# Altium PCB Relay-Switching-Board-v2.0.PcbDoc (part 5 of 5)
Units mil, origin at the board's own origin, x right, y up, seen from the top; angles counter-clockwise.
Board outline 5905.51 x 4330.71 mil, 4 copper layers (Top Layer, Layer 1, Layer 2, Bottom Layer), stack 62.047 mil thick; 211 components, 133 nets, 602 pads, 336 vias.
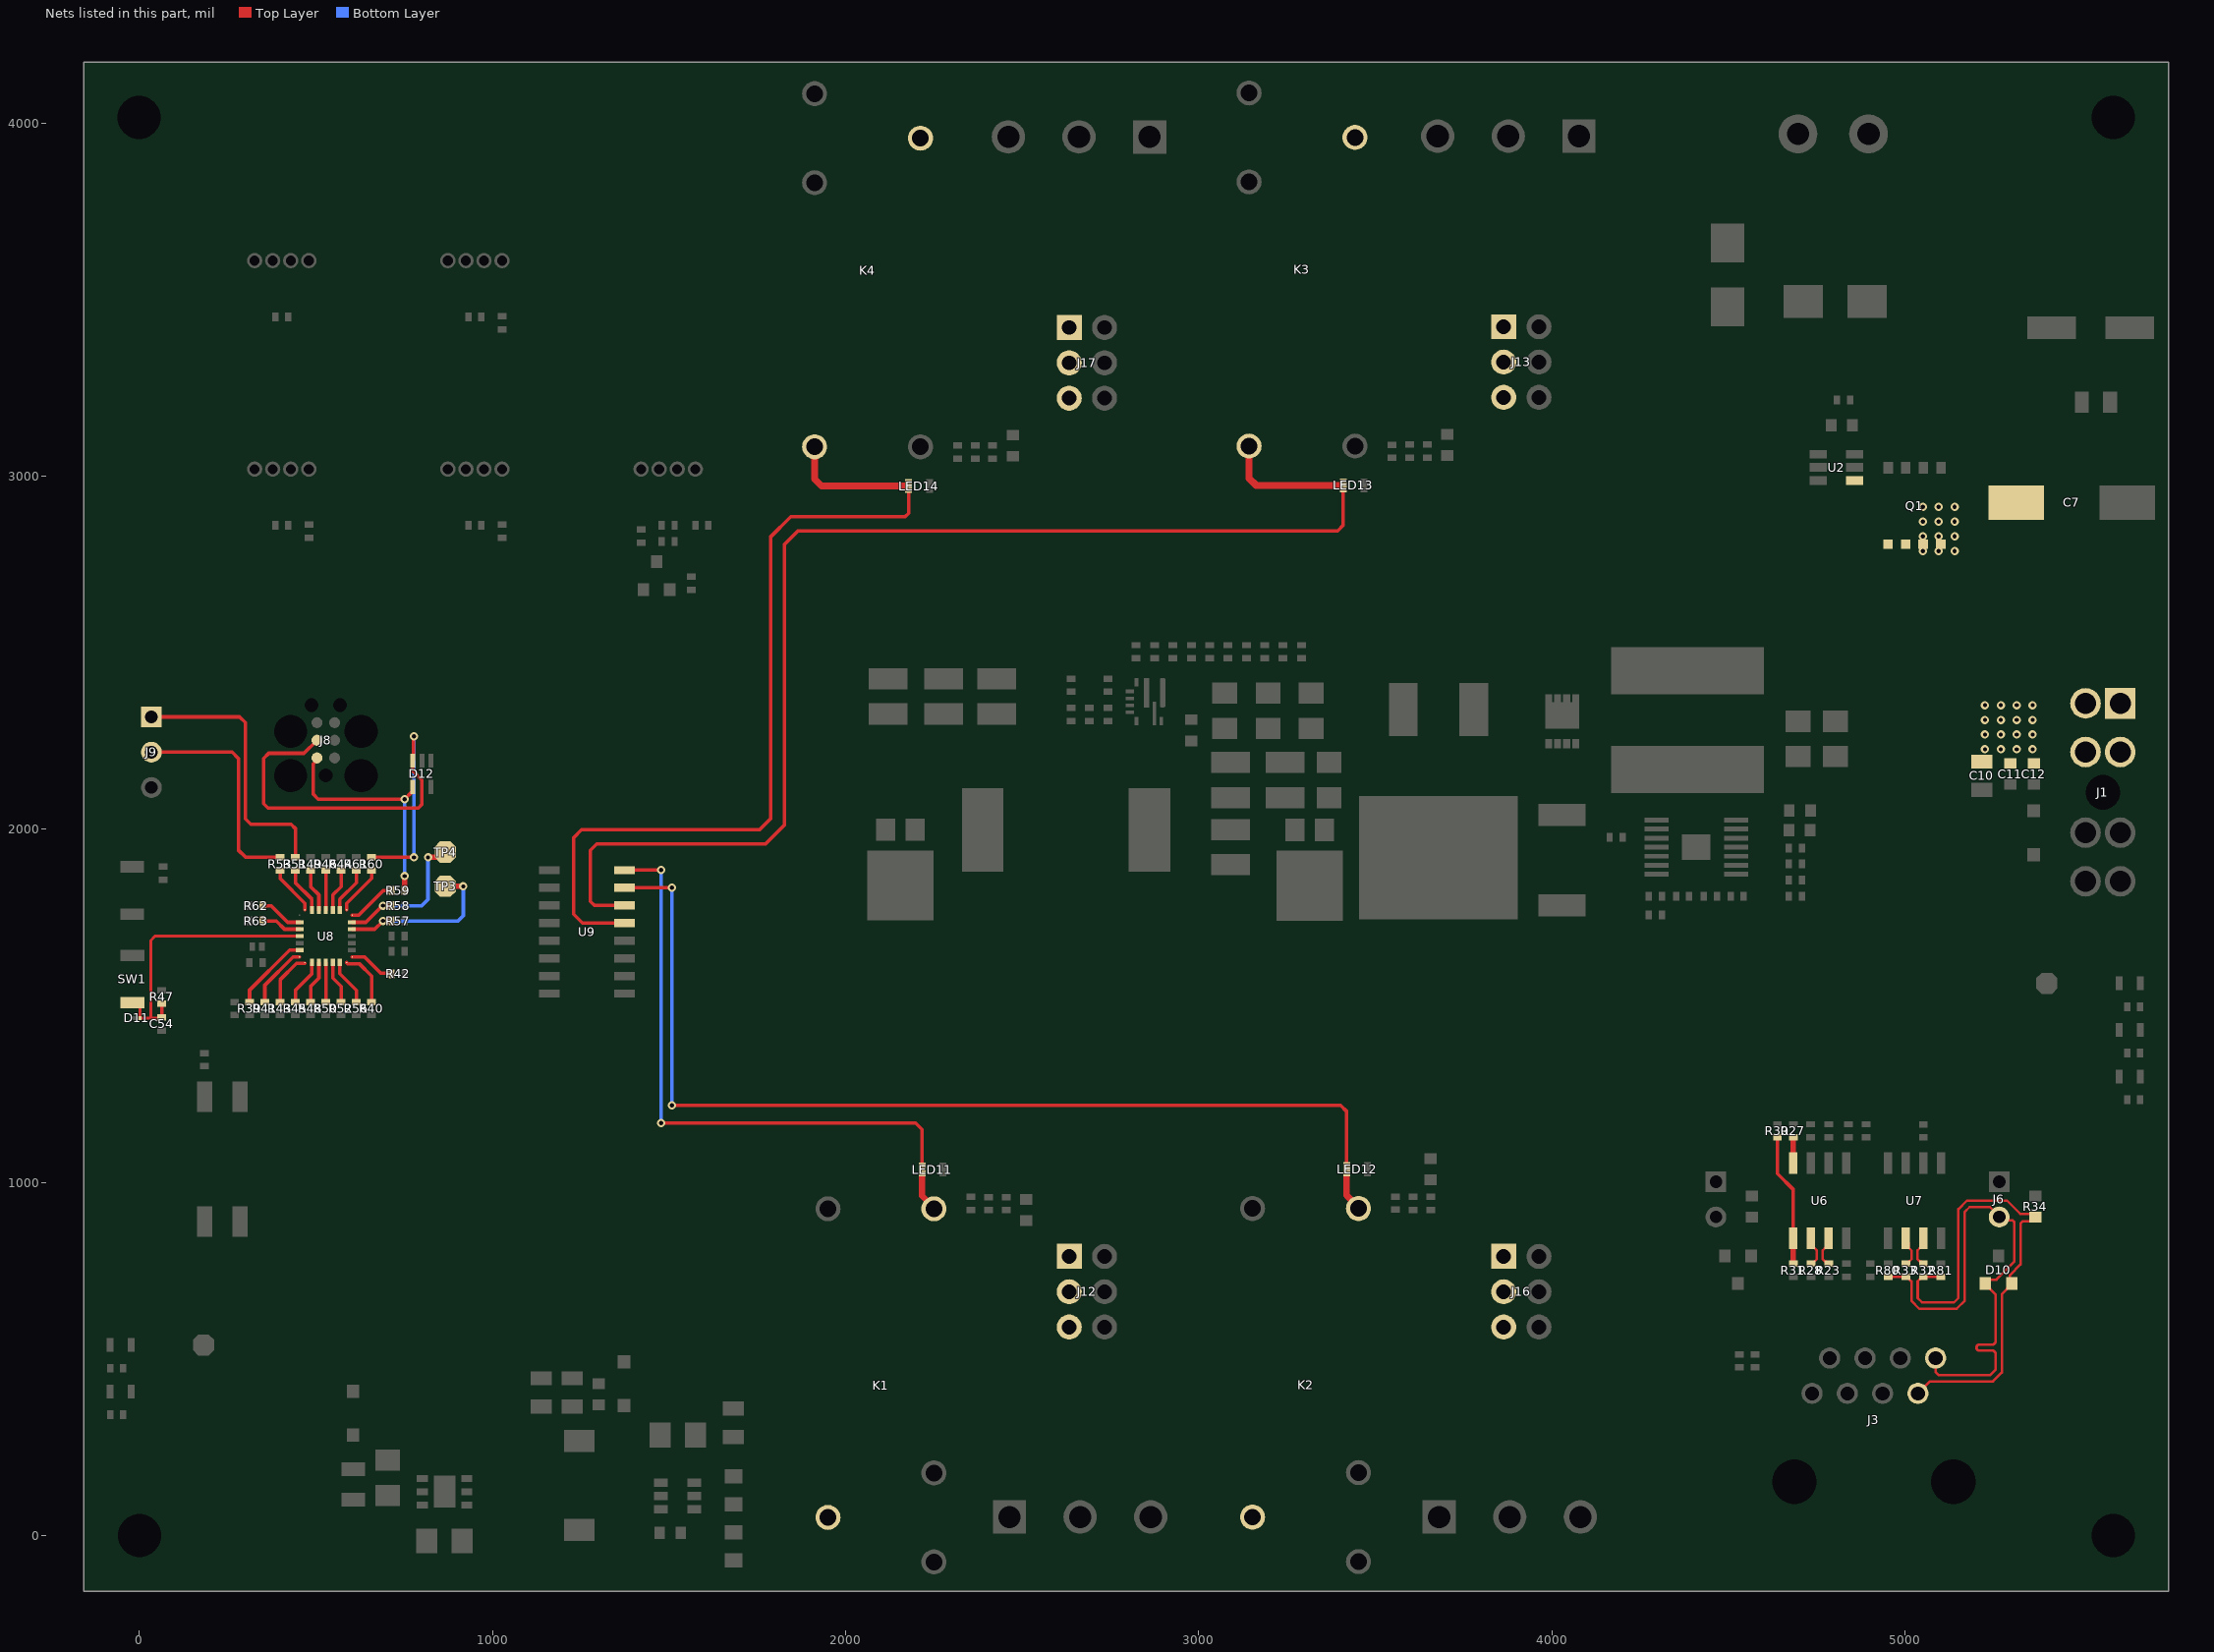
[diagram p5: the nets of this part, all layers, seen from the top]

## Via types
v1: diameter 23.62, hole 11.81, Top Layer to Bottom Layer, tented both sides, 336 vias

## Nets (pads, with @x,y where several pads share a name; then routed paths per layer and width w, separated by ;. In a path a pad name is that pad's centre, name@x,y a point inside that pad or via, vN(x,y) a via of type N, cw(c..) or ccw(c..) an arc to the next point about the centre after c; other vN are vias at no path point) (continued)
NetR23_1: R23.1 U6.7 | length 83.9
  Top Layer w7: R23.1@4784,769.84 4778.5,775.34 4774.47,775.34 4767.6,782.21 4767.6,807.91 4775.13,815.44 4775.68,815.44 4784,823.76 U6.7@4784,837.45
NetR27_2: R27.2 U6.4 | length 72.8
  Top Layer w15: U6.4@4683.99,1055.05 R27.2@4683.99,1127.84
NetR28_1: R28.1 U6.6 | length 79.9
  Top Layer w7: U6.6@4734,837.45 4742.3,829.14 4742.3,815.27 4750.54,807.03 4750.54,782.88 4743,775.34 R28.1@4737.5,769.84
NetR30_2: R30.2 R31.2 U6.5 | length 371.6
  Top Layer w10: R30.2@4638.99,1127.84 4638.99,1024.63 4683.99,979.63 U6.5@4683.99,842.45
  Top Layer w15: R31.2@4683.99,774.85 U6.5@4683.99,842.45
NetR32_1: R32.1 U7.7 | length 83.8
  Top Layer w7: R32.1@5052.29,769.83 5046.79,775.33 5042.76,775.33 5035.9,782.2 5035.9,807.81 5043.53,815.44 5043.98,815.44 5052.29,823.76 U7.7@5052.29,837.45
NetR33_1: R33.1 U7.6 | length 79.9
  Top Layer w7: U7.6@5002.29,837.45 5010.6,829.14 5010.6,815.24 5018.83,807 5018.83,782.87 5011.3,775.34 R33.1@5005.79,769.83
NRST_MCU: C54.2 D11.2 R47.2 SW1.1 U8.4 | length 806
  Top Layer w8: SW1.1@-20.17,1509.15 -10.73,1509.15 1.41,1497.01 D11.2@1.41,1465.51 ; D11.2@2.73,1465.51 32.1,1465.51 ; C54.2@63.48,1467.52 61.48,1465.51 32.1,1465.51 ; R47.2@63.48,1506.46 R47.2@63.82,1506.8 ; U8.4@454.2,1697.44 44.25,1697.44 32.1,1685.29 32.1,1465.51
  Top Layer w10: C54.2@63.48,1467.52 R47.2@63.48,1506.46
PA0: R39.2 U8.6 | length 222.5
  Top Layer w10: R39.2@312.13,1511.19 312.13,1544.7 425.5,1658.07 U8.6@454.2,1658.07
PA1: R41.2 U8.7 | length 178.5
  Top Layer w10: R41.2@355.31,1511.19 355.31,1558.79 434.9,1638.39 U8.7@453.21,1638.39
PA2: R43.2 U8.8 | length 154.3
  Top Layer w10: R43.2@398.48,1509.22 R43.2@398.48,1511.19 398.48,1573.69 445.28,1620.48 468.96,1620.48
PA3: R45.2 U8.9 | length 131.9
  Top Layer w10: R45.2@441.66,1509.22 441.66,1544 488.65,1590.99 U8.9@488.65,1621.65
PA4: R48.2 U8.10 | length 122.2
  Top Layer w10: R48.2@484.84,1509.22 484.84,1554.95 508.33,1578.44 U8.10@508.33,1621.65
PA5: R50.2 U8.11 | length 112.4
  Top Layer w10: R50.2@528.02,1509.22 U8.11@528.02,1621.65
PA6: R52.2 U8.12 | length 122.2
  Top Layer w10: U8.12@547.7,1621.65 547.7,1578.44 571.19,1554.95 R52.2@571.19,1509.22
PA7: R56.2 U8.13 | length 131.9
  Top Layer w10: U8.13@567.39,1621.65 567.39,1590.99 614.37,1544 R56.2@614.37,1509.22
PA11: R57.2 TP3.1 U8.19 | length 489.5
  Top Layer w10: U8.19@601.84,1717.13 666.36,1717.13 v1(689.86,1740.62)
  Top Layer w15: v1(689.86,1740.62) R57.2@714.26,1740.61 ; TP3.1@866.29,1838.51 v1(917.29,1838.51)
  Bottom Layer w10: v1(689.86,1740.62) 902.01,1740.62 917.29,1755.91 v1(917.29,1838.51)
PA12: R58.2 TP4.1 U8.20 | length 452.7
  Top Layer w10: U8.20@601.84,1736.81 641.4,1736.81 687.86,1783.27 693.33,1783.27 v1@693.85,1783.8
  Top Layer w15: v1@693.85,1783.8 R58.2@714.26,1783.79 ; v1@817.29,1919.63 v1@818.39,1919.63 ; v1@818.39,1920.63 TP4.1@868.37,1920.63 ; TP4.1@854.4,1923.74 TP4.1@866.29,1935.63
  Bottom Layer w10: v1(689.85,1783.8) 799.65,1783.8 817.29,1801.44 v1@817.29,1919.63
  other v1: 817.29,1920.69
PA13: R59.1 U8.21 | length 140.6
  Top Layer w10: U8.21@602.82,1756.5 621.13,1756.5 691.61,1826.97 R59.1@714.27,1826.97
PA14: R60.1 U8.22 | length 140.6
  Top Layer w10: U8.22@587.07,1772.24 587.07,1790.56 657.55,1861.03 R60.1@657.55,1883.69
PA15: R61.2 U8.23 | length 131.9
  Top Layer w10: U8.23@567.39,1771.26 567.39,1801.93 614.37,1848.91 R61.2@614.37,1883.69
PB0: R40.2 U8.14 | length 161.6
  Top Layer w10: U8.14@587.07,1622.64 590.05,1619.66 622.52,1619.66 657.55,1584.63 R40.2@657.55,1511.19 R40.2@657.55,1509.22
PB1: R42.2 U8.15 | length 130.4
  Top Layer w10: U8.15@602.82,1638.39 637.78,1638.39 683.57,1592.59 R42.2@714.26,1592.59
PB3: R44.2 U8.24 | length 122.2
  Top Layer w10: U8.24@547.7,1771.26 547.7,1814.47 571.19,1837.96 R44.2@571.2,1883.69
PB4: R46.2 U8.25 | length 112.4
  Top Layer w10: U8.25@528.02,1771.26 R46.2@528.02,1883.69
PB5: R49.2 U8.26 | length 122.2
  Top Layer w10: R49.2@484.84,1883.69 484.84,1837.96 508.33,1814.47 U8.26@508.33,1771.26
PB6: R51.2 U8.27 | length 131.9
  Top Layer w10: R51.2@441.66,1883.69 441.66,1848.91 488.65,1801.93 U8.27@488.65,1771.26
PB7: R53.2 U8.28 | length 140.6
  Top Layer w10: R53.2@398.49,1883.69 398.48,1861.03 468.96,1790.56 U8.28@468.96,1772.24
PF0: R62.2 U8.2 | length 124.9
  Top Layer w10: R62.2@348.76,1783.8 372.83,1783.8 419.81,1736.81 U8.2@454.2,1736.81
PF1: R63.2 U8.3 | length 115.2
  Top Layer w10: R63.2@348.76,1740.62 387.5,1740.62 410.99,1717.13 U8.3@454.2,1717.13
REL-PWR-1: J12.1 J12.3 J12.5 K1.2
REL-PWR-2: J16.1 J16.3 J16.5 K2.2
REL-PWR-3: J13.1 J13.3 J13.5 K3.2
REL-PWR-4: J17.1 J17.3 J17.5 K4.2
RELAY-1: K1.5 LED11.2 U9.16 | length 1805.3
  Top Layer w10: U9.16@1373.59,1884.63 v1(1477.29,1884.63) ; v1(1477.29,1168.44) 2198.21,1168.44 2216.71,1149.95 LED11.2@2216.71,1036.63
  Top Layer w18: LED11.2@2216.71,1036.63 2216.71,962.43 2250.07,929.06 K1.5@2250.07,925.46
  Bottom Layer w10: v1(1477.29,1168.44) v1(1477.29,1884.63)
RELAY-2: K2.5 LED12.2 U9.15 | length 2957.4
  Top Layer w10: U9.15@1373.59,1834.63 v1(1508.29,1834.63) ; v1(1508.29,1218.44) 3401.62,1218.44 3419.12,1200.94 LED12.2@3419.12,1037.49
  Top Layer w18: LED12.2@3419.12,1037.49 3419.12,963.29 3452.49,929.92 K2.5@3452.49,926.31
  Bottom Layer w10: v1(1508.29,1218.44) v1(1508.29,1834.63)
RELAY-3: K3.5 LED13.2 U9.14 | length 3722.9
  Top Layer w10: U9.14@1373.59,1784.63 1288.86,1784.63 1277.29,1796.2 1277.29,1940.47 1295.55,1958.73 1773.27,1958.73 1827.29,2012.75 1827.29,2807.62 1865.12,2845.45 3393.58,2845.45 3409.01,2860.88 LED13.2@3409.01,2974.19
  Top Layer w20: K3.5@3142.54,3105.37 3142.54,2993.98 3162.32,2974.2 LED13.2@3408.55,2974.2
RELAY-4: K4.5 LED14.2 U9.13 | length 2630.3
  Top Layer w10: U9.13@1373.59,1734.63 1254.69,1734.63 1229.67,1759.65 1229.67,1976.07 1252.33,1998.73 1756.7,1998.73 1787.29,2029.32 1787.29,2827.62 1845.12,2885.45 2168.52,2885.45 2178.6,2895.53 LED14.2@2178.6,2972.06
  Top Layer w20: K4.5@1912.13,3103.23 1912.13,2991.84 1931.91,2972.06 LED14.2@2178.15,2972.06
RS485_N: D10.2 J3.2 R32.2 R34.2 R81.1 | length 1503
  Top Layer w7: J3.2@5036.95,402.74 5070.94,436.72 5249.22,436.72 5274.29,461.79 5274.29,683.81 5289.21,698.74 5290.05,698.74 5302.69,711.38 D10.2@5302.69,713.35 5297.47,718.57 5297.47,737.86 5327.57,767.96 5327.57,883.9 5333.94,890.27 5357.82,890.27 R34.2@5369.32,901.77 5359.93,911.16 5326.45,911.16 5289.27,948.34 5175.65,948.34 5151.73,924.43 5151.73,672.92 5139.16,660.35 5048.31,660.35 5036.29,672.36 5036.29,720.32 5043.29,727.32 5048.79,732.83 R32.2@5052.29,732.83 ; R32.2@5052.29,732.83 R81.1@5102.29,732.85
RS485_P: D10.1 J3.1 J6.2 R33.2 R80.1 | length 1503
  Top Layer w7: R80.1@4952.29,732.85 R33.2@5002.29,732.84 5005.79,732.84 5011.29,727.34 5011.29,726.89 5018.29,719.89 5018.29,664.9 5040.85,642.35 5146.62,642.35 5169.73,665.47 5169.73,916.97 5183.1,930.34 5241.42,930.34 5266.95,904.81 J6.2@5266.95,902.24 5276.91,892.28 5305.47,892.28 5309.57,888.18 5309.57,775.42 5259.11,724.95 5240.53,724.95 5240.53,726.59 5227.88,713.95 D10.1@5227.88,713.35 5227.88,711.38 5240.53,698.74 5240.82,698.74 5256.29,683.28 5256.29,569.87 5256.29,549.37 cw(c5247.79,549.37) 5247.79,540.87 5211.07,540.87 ccw(c5211.07,532.37) 5211.07,523.87 5247.79,523.87 cw(c5247.79,515.37) 5256.29,515.37 5256.29,502.74 5256.29,469.25 5241.76,454.72 5095.29,454.72 5086.95,463.07 J3.1@5086.95,502.74
SWCLK: D12.3 J8.4 R60.2 | length 1422.7
  Top Layer w10: J8.4@503.02,2252.22 466.27,2215.47 366.1,2215.47 351.73,2201.1 351.73,2073.01 364.16,2060.57 790.02,2060.57 800.02,2070.56 800.02,2139.72 774.43,2165.31 D12.3@774.43,2194.84 776.19,2196.6 776.19,2262.52 v1(777.29,2263.63) ; R60.2@657.55,1920.69 v1@774.29,1920.69
  Bottom Layer w10: v1(777.29,1920.69) v1(777.29,2263.63)
SWDIO: D12.4 J8.2 R59.2 | length 675.6
  Top Layer w10: J8.2@503.02,2202.22 503.02,2196.83 492.06,2185.87 492.06,2099.87 506.3,2085.63 v1(751.29,2085.63) 771.02,2105.35 772.54,2105.35 774.43,2107.24 D12.4@774.43,2120.04
  Top Layer w15: R59.2@751.27,1826.97 v1(751.29,1867.63)
  Bottom Layer w10: v1(751.29,1867.63) v1(751.29,2085.63)
USART1_RX: J9.2 R53.1 | length 640
  Top Layer w10: J9.2@34.02,2218.5 262.8,2218.5 280.21,2201.1 280.21,1941.36 300.87,1920.7 R53.1@398.49,1920.69
USART1_TX: J9.1 R51.1 | length 779.9
  Top Layer w10: J9.1@34.02,2318.5 283.74,2318.5 300.21,2302.04 300.21,2029.55 315.55,2014.21 429.83,2014.21 441.66,2002.38 R51.1@441.66,1920.69
VIN: C7.1 C10.2 C11.2 C12.2 J1.1 J1.2 J1.7 J1.8 Q1.5 Q1.6 Q1.7 Q1.8 U2.4
  other v1: 5226.71,2226.69 5271.71,2226.69 5316.71,2226.69 5361.71,2226.69 5226.71,2268.34 5271.71,2268.34 5316.71,2268.34 5361.71,2268.34 5226.71,2309.98 5271.71,2309.98 5316.71,2309.98 5361.71,2309.98 5226.71,2351.62 5271.71,2351.62 5316.71,2351.62 5361.71,2351.62 5050.71,2788.03 5095.71,2788.03 5140.71,2788.03 5050.71,2829.67 5095.71,2829.67 5140.71,2829.67 5050.71,2871.31 5095.71,2871.31 5140.71,2871.31 5050.71,2912.95 5095.71,2912.95 5140.71,2912.95
pads on no net: D12.1 D12.5 J1. J3. J3.3 J3.6 J8.6 J8.MP1 J8.MP2 J8.MP3 J8.MP4 J8.MP5 J8.MP6 J8.MP7 LED10.1 U1.2 U1.13 U4.1 U4.4 U4.5 U5.1 U5.4 U5.5 U9.5 U9.6 U9.7 U9.10 U9.11 U9.12

## Polygon pours and split planes (outlines as drawn)
NetJ20_2 on Top Layer "NETJ20_2_L01_P050" (solid, pour order 50): 3373.28,3913.77 3373.28,4036.38 3744.01,4036.38 3744.01,3913.77 3973.28,3913.77 3973.28,4158.91 3078.11,4158.91 3078.11,3913.77
NetJ21_2 on Top Layer "NETJ21_2_L01_P001" (solid, pour order 1): 2157.29,3911.63 2157.29,4034.23 2528.07,4034.23 2528.07,3911.63 2757.29,3911.63 2757.29,4156.77 1862.13,4156.77 1862.13,3911.63
NetJ19_1 on Top Layer "NETJ19_1_L01_P049" (solid, pour order 49): 3404.14,100.02 3597.63,100.02 3597.63,1.37 3776.8,1.37 3776.8,239.56 3404.14,239.56
NetJ19_2 on Top Layer "NETJ19_2_L01_P048" (solid, pour order 48): 3404.14,-143.08 3977.23,-143.08 3977.23,239.56 3797.23,239.56 3797.23,-19.04 3404.14,-19.04
NetJ18_2 on Top Layer "NETJ18_2_L01_P009" (solid, pour order 9): 2187.29,-143.08 2760.39,-143.08 2760.39,239.56 2580.39,239.56 2580.39,-19.04 2187.29,-19.04
GND on Top Layer "GND_L01_P047" (solid, remove dead copper, pour order 47): 1839.29,4173.23 1839.29,3689.63 4211.29,3689.63 4211.29,4173.23 5747.3,4173.23 5747.3,-157.48 -158.22,-157.48 -158.22,4173.23
24V on Top Layer "24V_L01_P039" (solid, remove dead copper, pour order 39): 1835.29,319.53 1835.29,1019.63 2052.29,1019.63 2052.29,137.6 1539.39,137.6 1539.39,319.53
12V on Top Layer "12V_L01_P038" (solid, remove dead copper, pour order 38): 4331.17,650.63 4022.29,650.63 4022.29,748.14 3808.25,748.14 3808.25,650.63 2790,650.63 2790,746 2688.95,746 2688.95,849.54 3684.29,849.54 3684.29,1062.63 4331.17,1062.63
48V on Top Layer "48V_L01_P037" (solid, pour order 37): 3808.21,628.14 3808.21,534.87 3919.22,534.87 3919.22,628.14 4331.17,628.14 4331.17,346.63 2688.95,346.63 2688.95,628.14
24V on Top Layer "24V_L01_P033" (solid, remove dead copper, pour order 33): 5187.29,1979.63 5407.29,1979.63 5407.29,2089.63 5709.29,2089.63 5709.29,1794.63 5187.29,1794.63
VIN on Top Layer "VIN_L01_P032" (solid, remove dead copper, pour order 32): 5407.29,2164.63 5407.29,2110.13 5709.29,2110.13 5709.29,2854.63 5528.95,2854.63 5528.95,2974.47 4938.3,2974.47 4937.44,2975.33 4881.79,2975.33 4881.79,2999.79 4833.76,2999.79 4833.76,2399.63 5187.29,2399.63 5187.29,2164.63
NetC8_1 on Top Layer "NETC8_1_L01_P031" (solid, pour order 31): 4976.07,2999.63 4976.07,3050.17 4833.46,3050.17 4833.46,3542.19 4833.46,4145.49 5708.37,4145.49 5708.37,3481.4 5528.95,3481.4 5528.95,2999.63
48V on Top Layer "48V_L01_P022" (solid, pour order 22): 3808.25,3358.63 3808.25,3167.64 3919.11,3167.64 3919.11,3267.83 4013.68,3267.83 4013.68,3058.63 3735.29,3058.63 3735.29,3171.12 3084.29,3171.12 3084.29,3058.63 2689.03,3058.63 2689.03,3265.69 2788.52,3265.69 2788.52,3358.63
12V on Top Layer "12V_L01_P021" (solid, pour order 21): 2783.27,3385.69 4013.68,3385.69 4013.68,3603.63 2689.03,3603.63 2689.03,3385.69
NetJ18_1 on Top Layer "NETJ18_1_L01_P010" (solid, pour order 10): 2187.3,100.02 2380.79,100.02 2380.79,1.37 2559.96,1.37 2559.96,239.56 2187.3,239.56
NetJ20_1 on Top Layer "NETJ20_1_L01_P004" (solid, pour order 4): 3092.54,3712.05 4187.7,3711.77 4187.7,4044.34 4008.09,4044.34 4008.09,3893.23 3092.54,3893.23
NetJ21_1 on Top Layer "NETJ21_1_L01_P002" (solid, pour order 2): 1862.13,3709.91 2957.29,3709.63 2957.29,4042.2 2777.69,4042.2 2777.69,3891.09 1862.13,3891.09
GND on Bottom Layer "GND_L04_P046" (solid, remove dead copper, pour order 46): -158.22,-157.48 -158.22,4173.23 5747.3,4173.23 5747.3,-157.48
3V3 on Bottom Layer "3V3_L04_P045" (solid, pour order 45): 467.97,1364.63 966.93,1364.63 966.93,1267.66 183.95,1267.66 183.95,1933.19 728.69,1933.19 728.69,1677.63 495.71,1677.63 467.97,1649.89
REL-PWR-1 on Bottom Layer "REL-PWR-1_L04_P027" (solid, pour order 27): 2670.71,839.71 1850.88,839.71 1850.88,-21.9 2093.69,-21.9 2093.69,539.71 2670.71,539.71
24V on Bottom Layer "24V_L04_P030" (solid, pour order 30): 2790,3149.06 2790,3276.8 2697.84,3276.8 2697.84,3365.63 3323.29,3365.63 3323.29,3149.63 4020.28,3149.63 4020.28,3278.7 3928.09,3278.7 3928.09,3365.63 4342.29,3365.63 4342.29,2640.63 5717.04,2640.63 5717.04,1442 4202.29,1442 4202.29,645.99 3926.43,645.99 3926.43,735.13 4027.29,735.13 4027.29,860.89 3034.29,860.89 3034.29,645.99 2697.84,645.99 2697.84,734.63 2790,734.63 2790,860.1 1850.88,860.1 1850.88,1169.63 2697.84,1169.63 2697.84,2974.06 2120.29,2974.06 2120.29,3149.06
REL-PWR-2 on Bottom Layer "REL-PWR-2_L04_P017" (solid, pour order 17): 3906.03,840.57 3053.29,840.57 3053.29,-21.9 3296.11,-21.9 3296.11,540.57 3906.03,540.57
REL-PWR-3 on Bottom Layer "REL-PWR-3_L04_P019" (solid, pour order 19): 3907.7,3171.12 3347.29,3171.12 3347.29,4032.73 3586.16,4032.73 3586.16,3471.12 3907.7,3471.12
REL-PWR-4 on Bottom Layer "REL-PWR-4_L04_P018" (solid, pour order 18): 2677.29,3168.98 2120.29,3168.98 2120.29,4043.63 2355.75,4043.63 2355.75,3468.98 2677.29,3468.98
48V on Layer 2 "48V_L03_P029" (solid, pour order 29): 3173.29,402 3804.29,402 3804.29,846.2 4019.69,846.2 4019.69,634.45 3919.11,634.45 3919.11,402 4414.73,402 4414.73,1469.63 4178,1469.63 4178,4139 2962.29,4139 2962.29,1591.63 3173.29,1591.63
24V on Layer 2 "24V_L03_P053" (solid, pour order 53): 5713.41,1516 5713.41,2071.69 4232,2071.69 4232,1516
VIN on Layer 2 "VIN_L03_P052" (solid, pour order 52): 4232,3122 4232,2116.69 5713.41,2116.69 5713.41,3122
NetC8_1 on Layer 2 "NETC8_1_L03_P051" (solid, pour order 51): 4232,3168.01 4232,4145.49 5722.04,4145.49 5722.04,3168.01
3V3 on Layer 2 "3V3_L03_P044" (solid, pour order 44): 5152.29,1135.97 5152.29,592.46 4584.29,592.46 4584.29,1135.97
3V3 on Layer 2 "3V3_L03_P041" (solid, pour order 41): 2329,2826.13 2329,2179.38 1761.29,2179.38 1761.29,1532.63 2381.29,1532.63 2381.29,346.63 4466.29,346.63 4466.29,1469.63 5713.41,1469.63 5713.41,-132.37 1653.23,-132.37 1653.23,416.63 954.29,416.63 954.29,178.21 358.29,178.21 358.29,2826.13
5V on Layer 2 "5V_L03_P040" (solid, remove dead copper, pour order 40): 312.13,144.93 312.13,2869.63 2331,2869.63 2331,4173.23 -118.71,4173.23 -118.71,-132.37 1611.29,-132.37 1611.29,375.46 997.29,375.46 997.29,144.93
12V on Layer 2 "12V_L03_P028" (solid, pour order 28): 2578.06,846.84 2688.95,846.84 2688.95,402 3119.57,402 3119.57,1537.08 2906.29,1537.08 2906.29,4173.23 2389.29,4173.23 2389.29,2124.63 1821.29,2124.63 1821.29,1584.63 2444.29,1584.63 2444.29,846.84
GND on Layer 1 "GND_L02_P000" (solid, remove dead copper, pour order 0): -158.22,-157.48 -158.22,4173.23 5747.3,4173.23 5747.3,-157.48

## Other copper
Top Layer:
  rectangle net GND: 2791.54,2416.38 2879.85,2464.28
  rectangle net 24V: 2810.38,2472.08 2926.93,2493.58
  rectangle net GND: 826.94,36.93 901.43,181.51
  rectangle net GND: 4699.07,1980.41 5032.29,2070.95
  rectangle net GND: 2789.99,2506.17 3509.13,2530.53
  rectangle net GND: 2767.29,2405.71 2797.29,2521.56
  rectangle net GND: 2765.65,2403.13 2879.85,2428.19
  rectangle net GND: 2844.22,2371.26 2879.85,2428.19
  rectangle net GND: 1057.29,137.6 1519,161.67
  rectangle net NetC45_2: 547.75,50.27 768.31,144.45
  rectangle net GND: 833.67,151.82 942.93,171.51
  rectangle net 5V: 780.82,-35.26 816.94,98.6
  rectangle net 5V: 652.29,-54.3 844.18,22.51
  rectangle net 3V3: 450.29,156.94 638.6,318.63
  rectangle net NetC45_2: 581.67,105.87 819.19,144.45
  rectangle net GND: 1438.72,137.6 1512.01,464.63
  rectangle net 5V: 1102.17,210.53 1423.54,392.06
  rectangle net NetC20_1: 1102.17,100.2 1486.85,123.83
  rectangle net NetC20_1: 1102.17,-19.28 1423.54,123.83
  rectangle net 24V: 1539.39,137.6 1748.29,162.63
  rectangle net NetR11_1: 1551.97,100.2 1697.23,123.83
  rectangle net NetR11_1: 1651.29,-20.39 1713.29,123.83
  rectangle net GND: 5187.29,1999.63 5382.49,2143.52
  rectangle net NetD3_1: 4424.29,3419.63 4767.04,3567.95
  rectangle net NetC14_1: 4730.61,3050.19 4806.19,3161.48
  rectangle net GND: 5550.94,2876.05 5709.29,3454.76
  rectangle net 24V: 4148.01,2014.59 4600.8,2236.7
  rectangle net 24V: 4547.29,2086.68 4964.29,2236.7
  rectangle net 12V: 1954.29,1741.64 2249.57,1940.46
  rectangle net 48V: 2980.29,1741.35 3408.75,1851.63
  rectangle net GND: 3961.79,1744.49 4095.65,1930.7
  rectangle net GND: 4347.41,1848.11 4473.14,2007.47
  rectangle net GND: 4262.35,1891.6 4449.71,1905.11
  rectangle net GND: 2824.95,2344.18 2859.97,2428.19
  rectangle net GND: 2793.43,2344.18 2859.97,2358.72
  rectangle net GND: 2818.83,2404.57 2859.97,2428.19
  rectangle net NetC21_1: 2767.29,2235.57 2996.62,2265.57
  rectangle net NetC21_1: 2767.29,1741.64 2919.65,2265.57
  rectangle net NetC21_1: 2844.22,2029.62 2879.85,2334.58
  rectangle net NetC3_2: 3437.29,1741.35 3904.26,2119.53
  rectangle net NetC37_2: 2267.29,1741.64 2483.16,2356.76
  rectangle net NetC37_2: 1954.29,1959.63 2483.16,2356.76
  rectangle net 24V: 2889.89,2344.43 3490.29,2493.58
  rectangle net GND: 3035.4,2159.53 3490.29,2321.62
  rectangle net NetC3_2: 3035.4,1961.92 3904.26,2119.53
  rectangle net 24V: 4567.29,2035.95 4687.57,2070.95
  rectangle net NetD1_1: 3538.32,2264.57 4600.8,2516.23
  rectangle net NetQ2_1: 3982.3,2040.45 4050.7,2255.34
  rectangle net 5V: 1506.91,2802.28 1524.91,2872.58
  rectangle net NetQ3_3: 1408.51,2738.77 1487.91,2827.28
  rectangle net 3V3: 705.26,1641.76 723.26,1709.94
  pour cut-out: 3628.45,1032.49 3674.45,1032.49 3674.45,1052.49 3628.45,1052.49 3628.45,1153.15 4401.3,1153.15 4401.29,319.63 5410,319.63 5410,1462.63 171.69,1462.63 171.69,1296.95 171.69,1125.65 2194.64,1125.65 2194.64,870.02 2432.03,870.02 2432.03,1125.65 3397.06,1125.65 3397.06,870.02 3628.45,870.02
  pour cut-out: 46.38,1623.65 46.38,1561.55 87.49,1561.55 87.49,1480.59 87.49,1448.52 -13.91,1448.52 -13.91,1480.59 -66.18,1480.59 -66.18,1623.65
  pour cut-out: 4699.07,2259.63 4699.07,1879.52 4810.14,1879.52 4810.14,1669.63 3517.91,1669.63 3517.92,2259.63
  pour cut-out: 1081.78,-39.67 1081.78,137.6 1733.69,137.6 1733.69,-39.67
  pour cut-out: 148.29,2600.06 148.3,3749.63 1706.3,3749.63 1706.29,2600.07
  text "1" at 331.53,3976.64 h50
Layer 1:
  text "2" at 407.2,3976.64 h50
Layer 2:
  text "3" at 524.53,3976.64 h50
Bottom Layer:
  region net GND: 4369.6,2011.41 4369.6,1859.69 4450.65,1859.69 4450.65,2011.41
  rectangle net GND: 3950,1816.88 4101.72,1897.94
  pour cut-out: 4200,1442 4200,643 3906.03,643 3906.03,520.17 4395.42,520.17 4395.42,1230.98 5594.03,1230.98 5594.04,1442
  text "4" at 607.53,3976.64 h50
Multi-Layer:
  pour cut-out: 5589.82,3857.65 cw(c5589.82,4016.48) 5430.98,4016.48 cw(c5589.82,4016.48) 5589.82,4175.32 cw(c5589.82,4016.48) 5748.65,4016.48 cw(c5589.82,4016.48)
  pour cut-out: 5590.18,-158.47 cw(c5590.18,0.37) 5431.35,0.37 cw(c5590.18,0.37) 5590.18,159.2 cw(c5590.18,0.37) 5749.02,0.37 cw(c5590.18,0.37)
  pour cut-out: 0,-158.84 cw(c0,0) -158.84,0 cw(c0,0) 0,158.84 cw(c0,0) 158.84,0 cw(c0,0)
  pour cut-out: -0.74,3856.91 cw(c-0.74,4015.75) -159.57,4015.75 cw(c-0.74,4015.75) -0.74,4174.58 cw(c-0.74,4015.75) 158.1,4015.75 cw(c-0.74,4015.75)
  pour cut-out: 302.72,3954.64 302.72,4048.62 627.47,4048.62 627.47,3954.64

## Silkscreen, mask and mechanical layers (free items; w line width, h text height)
Top Overlay:
  lines w5: 1399.1,2876.63 1466.28,2876.63
  lines w7.5: 2522,2576 2698,2576 2698,2701 2522,2701 2522,2576 ; 2611,2283.61 2773,2283.61 2773,2366.85 2611,2366.85 2611,2283.61 ; 3019.94,2237 3371,2237 3371,2431 3019.94,2431 3019.94,2237 ; 3481,2542 3680,2542 3680,2685 3481,2685 3481,2542 ; 4655.74,709.63 4862.01,709.63 4862.01,794 4655.74,794 4655.74,709.63 ; 4874.86,709.63 5135,709.63 5135,794 4874.86,794 4874.86,709.63 ; 5227.58,2388.4 5359.9,2388.4 5359.9,2516.76 5227.58,2516.76 5227.58,2388.4 ; 5266.4,2096.82 5398.73,2096.82 5398.73,2216 5266.4,2216 5266.4,2096.82 ; 5329.16,398.81 5579.16,398.81 5579.16,528.81 5329.16,528.81 5329.16,398.81 ; 5329.95,547.14 5658.68,547.14 5658.68,685.91 5329.95,685.91 5329.95,547.14
  text "Canagey 1.0" at 696.52,3955.26 h200
  text "GND" at 4768.95,3756.63 h78.74 r180
  text "+24V" at 4997.27,3756.63 h78.74 r180
  text "RELAY 4" at 265.78,3754.43 h78.74
  text "RELAY 3" at 813.02,3754.43 h78.74
  text "GND" at 3754.64,3752.89 h78.74 r180
  text "NO" at 3954.64,3752.89 h78.74 r180
  text "NC" at 4154.64,3752.89 h78.74 r180
  text "GND" at 2538.65,3750.75 h78.74 r180
  text "NO" at 2738.65,3750.75 h78.74 r180
  text "NC" at 2938.65,3750.75 h78.74 r180
  text "POWER IN" at 5003.39,3681.36 h100 r180
  text "RELAY - 3" at 4154.64,3676.96 h100 r180
  text "RELAY - 4" at 2938.65,3674.4 h100 r180
  text "VOLT - SEL" at 2581.38,3496 h78.74
  text "VOLT - SEL" at 3814.43,3496 h78.74
  text "12V" at 4037.47,3400.63 h78.74
  text "12V" at 2807.07,3397 h78.74
  text "24V" at 4037.47,3290.71 h78.74
  text "24V" at 2807.07,3288.57 h78.74
  text "48V" at 2807.07,3188.49 h78.74
  text "48V" at 4037.47,3180.63 h78.74
  text "RELAY 1" at 265.78,3163.88 h78.74
  text "RELAY 2" at 813.02,3163.88 h78.74
  text "CAN IN" at 1373.53,3163.88 h78.74
  text "STATUS" at 3094.72,2946.84 h78.74
  text "STATUS" at 1864.31,2944.7 h78.74
  text "1" at 3651,2707 h60
  text "2" at 2474.14,2583.77 h60
  text "FUSE" at 5457.27,2529.35 h78.74
  text "1" at 3343.52,2451.13 h60
  text "5" at 5181.52,2394.86 h60
  text "TAG" at 376.93,2393.31 h78.74
  text "TX" at -39.68,2299.62 h60 r90
  text "2" at 2565.21,2290.07 h60
  text "5" at 5395.51,2235.47 h60
  text "RX" at -39.68,2208.01 h60 r90
  text "GND" at -39.68,2076.5 h60 r90
  text "UART" at -90.32,2069.5 h78.74 r90
  text "BOOT" at -98.73,1741.45 h78.74 r90
  text "24V" at 5450.52,1537.47 h60
  text "RESET" at -99.23,1474.73 h78.74 r90
  text "12V" at 5451.52,1406.23 h60
  text "48V" at 5450.41,1274.51 h60
  text "RS485" at 5295.88,1073.26 h78.74 r90
  text "CAN" at 4493.54,1072.39 h78.74 r90
  text "STATUS" at 3103.73,1009.59 h78.74
  text "STATUS" at 1901.31,1008.73 h78.74
  text "VOLT - SEL" at 3814.43,869.96 h78.74
  text "VOLT - SEL" at 2581.38,869.1 h78.74
  text "12V" at 4037.47,767.94 h78.74
  text "12V" at 2807.07,767.08 h78.74
  text "3" at 5147.1,756.69 h60
  text "ID1" at 210.99,741.13 h60 r90
  text "ID0" at 310.99,740.9 h60 r90
  text "4" at 4607.64,717.49 h60
  text "24V" at 4037.47,657.86 h78.74
  text "24V" at 2807.07,657 h78.74
  text "SLAVE CAN IN" at 4611.95,567.92 h100
  text "3" at 5284.29,557.64 h60
  text "48V" at 4037.47,547.94 h78.74
  text "48V" at 2807.07,547.08 h78.74
  text "5V0" at 25.39,513.92 h60
  text "4" at 5279.7,404.43 h60
  text "3V3" at 25.45,382.2 h60
  text "RELAY - 1" at 2386.24,339.29 h100
  text "RELAY - 2" at 3603.08,339.29 h100
  text "NC" at 2386.24,262.93 h78.74
  text "NO" at 2586.24,262.93 h78.74
  text "GND" at 2786.24,262.93 h78.74
  text "NC" at 3603.08,262.93 h78.74
  text "NO" at 3803.08,262.93 h78.74
  text "GND" at 4003.08,262.93 h78.74
Bottom Overlay:
  text "Rev-v2.0" at -106.66,2899.43 h60 r270
  text "RELAY SWITCHING BOARD" at -0.19,2512.97 h60 r270
Top Solder:
  region: 297.88,4051.89 297.88,3949.06 632.53,3949.06 632.53,4051.89
Bottom Solder:
  region: 297.88,4051.63 297.88,3949.06 632.53,3949.06 632.53,4051.63
Board Outline:
  the board outline again, w10
Fabrication:
  drawing of 295 lines, arcs and shapes, not listed
  text "Layer" at 6975.58,4067 h60
  text "Name" at 7385.49,4067 h60
  text "Material" at 8315.23,4067 h60
  text "Thickness" at 9175,4067 h60
  text "Constant" at 9824.84,4067 h60
  text "Board Layer Stack" at 10394.7,4067 h60
  text "Top Overlay" at 7385.49,3947 h60
  text "Top Solder" at 7385.49,3827 h60
  text "Solder Resist" at 8315.23,3827 h60
  text "0.010mm" at 9175,3827 h60
  text "3.5" at 9824.84,3827 h60
  text "1" at 6975.58,3707 h60
  text "Top Layer" at 7385.49,3707 h60
  text "0.035mm" at 9175,3707 h60
  text "Dielectric 2" at 7385.49,3587 h60
  text "PP-006" at 8315.23,3587 h60
  text "0.203mm" at 9175,3587 h60
  text "4.4" at 9824.84,3587 h60
  text "2" at 6975.58,3467 h60
  text "Layer 1" at 7385.49,3467 h60
  text "CF-004" at 8315.23,3467 h60
  text "0.035mm" at 9175,3467 h60
  text "Dielectric 1" at 7385.49,3347 h60
  text "FR-4" at 8315.23,3347 h60
  text "1.030mm" at 9175,3347 h60
  text "4.6" at 9824.84,3347 h60
  text "3" at 6975.58,3227 h60
  text "Layer 2" at 7385.49,3227 h60
  text "CF-004" at 8315.23,3227 h60
  text "0.035mm" at 9175,3227 h60
  text "Dielectric 3" at 7385.49,3107 h60
  text "PP-006" at 8315.23,3107 h60
  text "0.203mm" at 9175,3107 h60
  text "4.4" at 9824.84,3107 h60
  text "4" at 6975.58,2987 h60
  text "Bottom Layer" at 7385.49,2987 h60
  text "0.035mm" at 9175,2987 h60
  text "Bottom Solder" at 7385.49,2867 h60
  text "Solder Resist" at 8315.23,2867 h60
  text "0.010mm" at 9175,2867 h60
  text "3.5" at 9824.84,2867 h60
  text "Bottom Overlay" at 7385.49,2747 h60
  text "Total board thickness:" at 6975.58,2627 h60
  text "1.596mm" at 9175,2627 h60
Drill Drawing:
  circle w10: c-47.48,6839.33 r20
  circle w10: c-47.48,6839.33 r33.33
  circle w10: c-47.48,5489.33 r33.33
  lines w10: -80.82,5172.67 -64.15,5172.67 -47.48,5156 -30.82,5172.67 -14.15,5172.67 -30.82,5189.33 -14.15,5206 -30.82,5206 -47.48,5222.67 -64.15,5206 -80.82,5206 -64.15,5189.33 -80.82,5172.67 ; -80.82,5306 -14.15,5306 -14.15,5372.67 -80.82,5372.67 -80.82,5306 ; -80.82,5672.67 -14.15,5672.67 -47.48,5606 -80.82,5672.67 ; -80.82,5822.67 -14.15,5822.67 -47.48,5756 -80.82,5822.67 ; -80.82,5906 -47.48,5922.67 -14.15,5906 -30.82,5939.33 -14.15,5972.67 -47.48,5956 -80.82,5972.67 -64.15,5939.33 -80.82,5906 ; -80.82,6056 -14.15,6056 -14.15,6122.67 -80.82,6122.67 -80.82,6056 ; -80.82,6239.33 -47.48,6206 -14.15,6239.33 -47.48,6272.67 -80.82,6239.33 ; -80.82,6356 -47.48,6372.67 -14.15,6356 -30.82,6389.33 -14.15,6422.67 -47.48,6406 -80.82,6422.67 -64.15,6389.33 -80.82,6356 ; -80.82,6506 -80.82,6522.67 -64.15,6539.33 -80.82,6556 -80.82,6572.67 -64.15,6572.67 -47.48,6556 -30.82,6572.67 -14.15,6572.67 -14.15,6556 -30.82,6539.33 -14.15,6522.67 -14.15,6506 -30.82,6506 -47.48,6522.67 -64.15,6506 -80.82,6506 ; -80.82,6672.67 -64.15,6672.67 -64.15,6656 -30.82,6656 -30.82,6672.67 -14.15,6672.67 -14.15,6706 -30.82,6706 -30.82,6722.67 -64.15,6722.67 -64.15,6706 -80.82,6706 -80.82,6672.67 ; -80.82,6972.67 -64.15,6972.67 -47.48,6956 -30.82,6972.67 -14.15,6972.67 -30.82,6989.33 -14.15,7006 -30.82,7006 -47.48,7022.67 -64.15,7006 -80.82,7006 -64.15,6989.33 -80.82,6972.67 ; -67.48,5179.33 -57.48,5179.33 -47.48,5169.33 -37.48,5179.33 -27.48,5179.33 -37.48,5189.33 -27.48,5199.33 -37.48,5199.33 -47.48,5209.33 -57.48,5199.33 -67.48,5199.33 -57.48,5189.33 -67.48,5179.33 ; -67.48,5659.33 -27.48,5659.33 -47.48,5619.33 -67.48,5659.33 ; -67.48,6069.33 -27.48,6069.33 -27.48,6109.33 -67.48,6109.33 -67.48,6069.33 ; -67.48,6369.33 -47.48,6379.33 -27.48,6369.33 -37.48,6389.33 -27.48,6409.33 -47.48,6399.33 -67.48,6409.33 -57.48,6389.33 -67.48,6369.33
  lines w15: -140.61,5111 10980.28,5111 ; -140.61,7061 10980.28,7061 ; 410.27,4961 410.27,7211 ; 1000.11,4961 1000.11,7211 ; 2149.77,4961 2149.77,7211 ; 2655.65,4961 2655.65,7211 ; 3389.45,4961 3389.45,7211 ; 4889,4961 4889,7211 ; 5478.85,4961 5478.85,7211 ; 6224.65,4961 6224.65,7211 ; 7414.3,4961 7414.3,7211 ; 8268.06,4961 8268.06,7211 ; 9601.67,4961 9601.67,7211 ; -140.61,4961 10980.28,4961 10980.28,7211 -140.61,7211 -140.61,4961
  text "Symbol" at -50.61,7106 h72
  text "Count" at 455.27,7106 h72
  text "Hole Size" at 1045.11,7106 h72
  text "Plated" at 2194.77,7106 h72
  text "Hole Type" at 2700.65,7106 h72
  text "Drill Layer Pair" at 3434.45,7106 h72
  text "Via/Pad" at 4934,7106 h72
  text "Pad Shape" at 5523.85,7106 h72
  text "Template" at 6269.65,7106 h72
  text "Description" at 7459.3,7106 h72
  text "Hole Tolerance (+)" at 8313.06,7106 h72
  text "Hole Tolerance (-)" at 9646.67,7106 h72
  text "1" at 455.27,6956 h60
  text "98.43mil (2.500mm)" at 1045.11,6956 h60
  text "NPTH" at 2194.77,6956 h60
  text "Round" at 2700.65,6956 h60
  text "Top Layer - Bottom Layer" at 3434.45,6956 h60
  text "Pad" at 4934,6956 h60
  text "Rounded" at 5523.85,6956 h60
  text "c0hn250p0" at 6269.65,6956 h60
  text "2" at 455.27,6806 h60
  text "125.98mil (3.200mm)" at 1045.11,6806 h60
  text "NPTH" at 2194.77,6806 h60
  text "Round" at 2700.65,6806 h60
  text "Top Layer - Bottom Layer" at 3434.45,6806 h60
  text "Pad" at 4934,6806 h60
  text "Rounded" at 5523.85,6806 h60
  text "c0hn320p0" at 6269.65,6806 h60
  text "3" at 455.27,6656 h60
  text "39.02mil (0.991mm)" at 1045.11,6656 h60
  text "NPTH" at 2194.77,6656 h60
  text "Round" at 2700.65,6656 h60
  text "Top Layer - Bottom Layer" at 3434.45,6656 h60
  text "Pad" at 4934,6656 h60
  text "Rounded" at 5523.85,6656 h60
  text "c0hn99" at 6269.65,6656 h60
  text "4" at 455.27,6506 h60
  text "93.50mil (2.375mm)" at 1045.11,6506 h60
  text "NPTH" at 2194.77,6506 h60
  text "Round" at 2700.65,6506 h60
  text "Top Layer - Bottom Layer" at 3434.45,6506 h60
  text "Pad" at 4934,6506 h60
  text "Rounded" at 5523.85,6506 h60
  text "c0hn238" at 6269.65,6506 h60
  text "4" at 455.27,6356 h60
  text "122.05mil (3.100mm)" at 1045.11,6356 h60
  text "PTH" at 2194.77,6356 h60
  text "Round" at 2700.65,6356 h60
  text "Top Layer - Bottom Layer" at 3434.45,6356 h60
  text "Pad" at 4934,6356 h60
  text "Rounded" at 5523.85,6356 h60
  text "c0h310" at 6269.65,6356 h60
  text "7" at 455.27,6206 h60
  text "35.43mil (0.900mm)" at 1045.11,6206 h60
  text "PTH" at 2194.77,6206 h60
  text "Round" at 2700.65,6206 h60
  text "Top Layer - Bottom Layer" at 3434.45,6206 h60
  text "Pad" at 4934,6206 h60
  text "(Mixed)" at 5523.85,6206 h60
  text "(Mixed)" at 6269.65,6206 h60
  text "8" at 455.27,6056 h60
  text "39.37mil (1.000mm)" at 1045.11,6056 h60
  text "PTH" at 2194.77,6056 h60
  text "Round" at 2700.65,6056 h60
  text "Top Layer - Bottom Layer" at 3434.45,6056 h60
  text "Pad" at 4934,6056 h60
  text "Rounded" at 5523.85,6056 h60
  text "c152h100m163mx163p0" at 6269.65,6056 h60
  text "8" at 455.27,5906 h60
  text "59.06mil (1.500mm)" at 1045.11,5906 h60
  text "PTH" at 2194.77,5906 h60
  text "Round" at 2700.65,5906 h60
  text "Top Layer - Bottom Layer" at 3434.45,5906 h60
  text "Pad" at 4934,5906 h60
  text "(Mixed)" at 5523.85,5906 h60
  text "(Mixed)" at 6269.65,5906 h60
  text "14" at 455.27,5756 h60
  text "62.99mil (1.600mm)" at 1045.11,5756 h60
  text "PTH" at 2194.77,5756 h60
  text "Round" at 2700.65,5756 h60
  text "Top Layer - Bottom Layer" at 3434.45,5756 h60
  text "Pad" at 4934,5756 h60
  text "(Mixed)" at 5523.85,5756 h60
  text "(Mixed)" at 6269.65,5756 h60
  text "20" at 455.27,5606 h60
  text "28.35mil (0.720mm)" at 1045.11,5606 h60
  text "PTH" at 2194.77,5606 h60
  text "Round" at 2700.65,5606 h60
  text "Top Layer - Bottom Layer" at 3434.45,5606 h60
  text "Pad" at 4934,5606 h60
  text "Rounded" at 5523.85,5606 h60
  text "c110h72m120mx120p0" at 6269.65,5606 h60
  text "20" at 455.27,5456 h60
  text "47.24mil (1.200mm)" at 1045.11,5456 h60
  text "PTH" at 2194.77,5456 h60
  text "Round" at 2700.65,5456 h60
  text "Top Layer - Bottom Layer" at 3434.45,5456 h60
  text "Pad" at 4934,5456 h60
  text "Rounded" at 5523.85,5456 h60
  text "c180h120" at 6269.65,5456 h60
  text "24" at 455.27,5306 h60
  text "41.34mil (1.050mm)" at 1045.11,5306 h60
  text "PTH" at 2194.77,5306 h60
  text "Round" at 2700.65,5306 h60
  text "Top Layer - Bottom Layer" at 3434.45,5306 h60
  text "Pad" at 4934,5306 h60
  text "(Mixed)" at 5523.85,5306 h60
  text "(Mixed)" at 6269.65,5306 h60
  text "336" at 455.27,5156 h60
  text "11.81mil (0.300mm)" at 1045.11,5156 h60
  text "PTH" at 2194.77,5156 h60
  text "Round" at 2700.65,5156 h60
  text "Top Layer - Bottom Layer" at 3434.45,5156 h60
  text "Via" at 4934,5156 h60
  text "Rounded" at 5523.85,5156 h60
  text "v60h30m0mx0" at 6269.65,5156 h60
  text "451 Total" at 455.27,5006 h60

## Dimensions
5747.3,4173.23 to 5747.3,-157.48 on Dimensions
-158.22,4173.23 to 5747.3,4173.23 on Dimensions

## Text inside footprints (layer, text, board x,y; h text height)
J1: Top Overlay "1" at 5601.76,2424.8 h31.5 r270
SW2: Top Overlay "ON" at 310.09,976.19 h19.68 r180; Top Overlay "1" at 289.22,1173.01 h19.68 r180; Top Overlay "2" at 189.22,1172.31 h19.68 r180